# Altium PCB flexible-hand-warmer-left.PcbDoc (part 2 of 3)
Units mm, origin at the board's own origin, x right, y up, seen from the top; angles counter-clockwise.
Board outline 135.63 x 180.34 mm, 18 copper layers (F.Cu, F.Mask, B.Cu, B.Mask, F.SilkS, B.SilkS, F.Adhes, B.Adhes, F.Paste, B.Paste, Dwgs.User, Cmts.User, Eco1.User, Eco2.User, Edge.Cuts, Margin, B.CrtYd, F.CrtYd); 2 components, 1 nets, 2 pads, 0 vias.
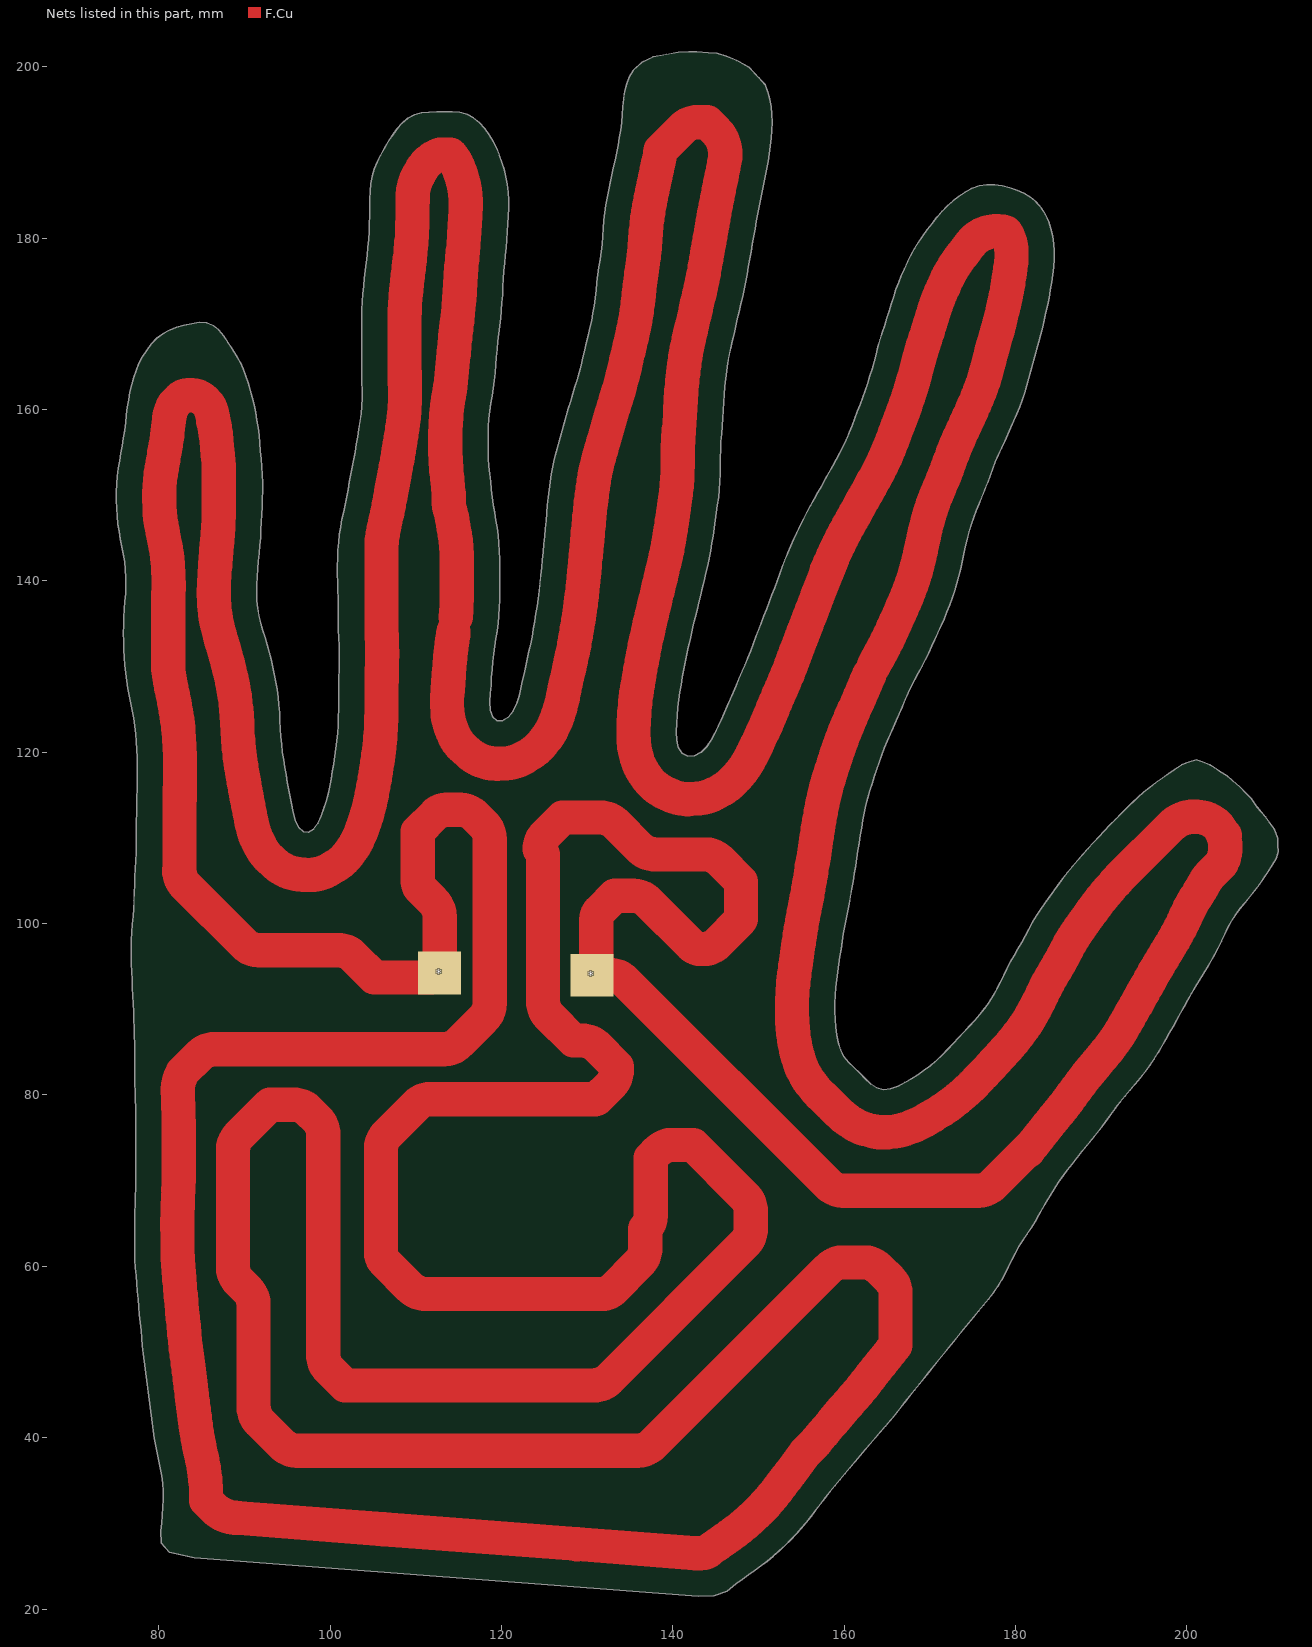
[diagram p4: the nets of this part, all layers, seen from the top]

## Nets (pads, with @x,y where several pads share a name; then routed paths per layer and width w, separated by ;. In a path a pad name is that pad's centre, name@x,y a point inside that pad or via, vN(x,y) a via of type N, cw(c..) or ccw(c..) an arc to the next point about the centre after c; other vN are vias at no path point)
GND: *.1 | length 1512.7
  F.Cu w4: 82.359,106.272 ccw(c84.899,106.272) 83.103,104.476 ; 86.356,158.582 cw(c82.571,157.286) 86.521,157.917 ; 86.441,139.683 86.415,138.76 ccw(c91.413,138.621) 86.415,138.498 86.437,137.586 ccw(c91.436,137.702) 86.459,137.223 86.544,136.331 ccw(c91.522,136.805) 86.611,135.866 86.777,134.996 ccw(c91.689,135.926) 86.849,134.674 87.068,133.823 ccw(c91.91,135.067) 87.097,133.713 87.332,132.876 ccw(c92.148,134.219) 87.367,132.755 87.595,132.011 cw(c83.769,130.842) 87.619,131.928 87.822,131.21 cw(c83.972,130.124) 87.83,131.179 88.032,130.441 ; 86.441,139.683 cw(c91.439,139.551) 86.445,139.801 86.49,140.719 cw(c91.484,140.477) 86.498,140.842 86.566,141.771 cw(c91.552,141.403) 86.568,141.804 86.64,142.7 ccw(c82.652,143.018) 86.641,142.715 86.71,143.625 cw(c91.695,143.236) 86.719,143.728 86.77,144.249 86.805,144.603 ccw(c82.824,144.992) 86.808,144.636 86.873,145.363 ccw(c82.889,145.719) 86.882,145.489 86.924,146.218 ccw(c82.93,146.447) 86.925,146.248 86.967,147.084 ccw(c82.972,147.284) 86.968,147.111 86.985,147.49 86.985,153.269 ccw(c82.988,153.117) 86.985,153.273 86.976,153.497 ccw(c82.979,153.345) 86.968,153.648 86.952,153.849 ccw(c82.964,153.546) 86.95,153.879 86.878,154.742 ccw(c82.892,154.408) 86.876,154.757 86.798,155.648 ccw(c82.813,155.299) 86.798,155.652 86.732,156.394 ccw(c82.748,156.041) 86.716,156.542 86.64,157.147 ccw(c82.671,156.646) 86.624,157.261 86.566,157.628 86.524,157.9 ; 88.032,130.441 cw(c84.174,129.386) 88.05,130.372 88.231,129.659 cw(c84.355,128.674) 88.246,129.601 88.41,128.913 cw(c84.519,127.986) 88.431,128.817 88.564,128.191 cw(c84.652,127.359) 88.588,128.071 88.714,127.375 cw(c84.777,126.664) 88.721,127.331 88.838,126.643 cw(c84.894,125.976) 88.858,126.513 88.943,125.879 cw(c84.98,125.343) 88.956,125.777 89.03,125.099 cw(c85.053,124.666) 89.039,124.999 89.096,124.323 cw(c85.11,123.989) 89.104,124.211 89.145,123.476 cw(c85.151,123.254) 89.148,123.419 89.183,122.558 ccw(c94.179,122.76) 89.188,122.457 89.244,121.54 ccw(c94.235,121.836) 89.256,121.375 89.34,120.469 ccw(c94.319,120.925) 89.353,120.343 89.457,119.449 ccw(c94.424,120.022) 89.477,119.301 89.604,118.417 ccw(c94.553,119.13) 89.626,118.281 89.776,117.406 cw(c85.833,116.731) 89.777,117.402 89.925,116.528 ccw(c94.855,117.362) 89.933,116.482 90.089,115.607 ccw(c95.012,116.481) 90.098,115.559 90.201,115.012 90.263,114.681 ccw(c95.177,115.603) 90.267,114.66 90.433,113.791 ccw(c95.345,114.726) 90.44,113.755 90.608,112.898 cw(c86.682,112.129) 90.609,112.89 90.779,112.014 ccw(c95.689,112.962) 90.853,111.691 91.09,110.782 ccw(c95.929,112.042) 91.458,109.803 91.856,109.008 ccw(c96.33,111.239) 92.926,107.576 93.46,107.081 ccw(c96.863,110.744) 96.291,105.777 96.878,105.709 ccw(c97.46,110.675) 97.345,105.676 ccw(c97.46,110.675) 100.022,106.381 100.615,106.734 ccw(c98.06,111.032) 102.074,108.05 102.589,108.743 ccw(c98.578,111.728) 103.153,109.71 103.531,110.566 ccw(c98.958,112.588) 103.673,110.922 103.974,111.774 ccw(c99.259,113.44) 104.021,111.915 104.288,112.745 ccw(c99.529,114.278) 104.358,112.983 104.585,113.831 ccw(c99.757,115.129) 104.641,114.06 104.831,114.928 ccw(c99.947,115.997) 104.865,115.1 105.026,115.975 ccw(c100.108,116.876) 105.031,116.003 105.187,116.883 ccw(c100.264,117.758) 105.196,116.936 105.344,117.821 ccw(c100.412,118.643) 105.355,117.889 105.49,118.779 ccw(c100.547,119.533) 105.499,118.84 105.625,119.729 ccw(c100.673,120.427) 105.632,119.781 105.748,120.677 ccw(c100.791,121.325) 105.765,120.823 105.857,121.731 ccw(c100.882,122.233) 105.876,121.988 105.922,122.912 ccw(c100.928,123.16) 105.926,123.002 105.955,123.925 105.988,124.855 ccw(c100.992,125.034) 105.991,124.985 106.001,125.917 ccw(c101.001,125.966) 106.001,126.003 105.995,126.867 cw(c109.995,126.891) 105.995,126.917 106.001,127.742 cw(c110.001,127.713) 106.001,127.769 106.01,128.379 106.013,128.625 cw(c110.013,128.563) 106.014,128.643 106.033,129.542 ccw(c101.034,129.646) 106.033,129.551 106.05,130.484 ccw(c101.051,130.579) 106.051,130.487 106.068,131.418 ccw(c101.069,131.51) 106.068,131.607 106.051,132.527 ccw(c101.051,132.439) 106.047,132.654 106.006,133.596 ccw(c101.011,133.381) 106.004,133.633 105.978,134.154 105.978,144.058 cw(c109.978,144.058) 106.005,144.521 106.027,144.707 cw(c110,144.242) 106.042,144.821 106.129,145.413 cw(c110.086,144.831) 106.153,145.562 106.264,146.154 cw(c110.196,145.419) 106.284,146.255 106.443,146.996 cw(c110.354,146.156) 106.445,147.005 106.631,147.862 ccw(c101.745,148.924) 106.647,147.937 106.822,148.806 ccw(c101.921,149.798) 106.838,148.891 106.997,149.75 107.09,150.235 107.162,150.605 ccw(c102.252,151.553) 107.163,150.61 107.331,151.487 ccw(c102.421,152.429) 107.336,151.511 107.5,152.389 ccw(c102.585,153.308) 107.511,152.451 107.65,153.249 cw(c111.59,152.559) 107.663,153.318 107.817,154.111 ccw(c102.909,155.066) 107.843,154.259 107.988,155.14 ccw(c103.055,155.952) 107.99,155.15 108.132,156.025 108.278,156.899 ccw(c103.347,157.723) 108.292,156.985 108.425,157.876 ccw(c103.48,158.615) 108.435,157.95 108.556,158.854 ccw(c103.601,159.518) 108.582,159.08 108.661,159.986 ccw(c103.681,160.425) 108.672,160.138 108.724,161.043 ccw(c103.733,161.33) 108.733,161.323 108.734,162.242 ccw(c103.734,162.249) 108.733,162.358 108.712,163.262 cw(c112.711,163.352) 108.712,163.286 108.697,164.187 ccw(c103.698,164.106) 108.696,164.222 108.678,165.021 cw(c112.677,165.11) 108.677,165.147 108.685,165.952 ccw(c103.685,166.001) 108.685,166.001 108.685,167.894 ccw(c103.685,167.894) 108.685,167.9 108.684,168.847 ccw(c103.684,168.84) 108.684,168.882 108.676,169.756 cw(c112.676,169.787) 108.676,169.821 108.679,170.154 108.684,170.615 cw(c112.683,170.575) 108.685,170.675 108.705,171.461 cw(c112.704,171.355) 108.707,171.528 108.74,172.263 cw(c112.736,172.084) 108.745,172.362 108.794,173.052 cw(c112.784,172.771) 108.802,173.153 108.878,173.94 cw(c112.859,173.552) 108.878,173.943 108.964,174.801 cw(c112.944,174.404) 108.967,174.836 109.051,175.607 cw(c113.027,175.17) 109.061,175.686 109.165,176.487 ccw(c104.208,177.139) 109.171,176.53 109.281,177.429 ccw(c104.319,178.04) 109.297,177.573 109.382,178.483 ccw(c104.404,178.951) 109.384,178.505 109.466,179.418 ccw(c104.486,179.863) 109.473,179.51 109.538,180.425 ccw(c104.551,180.782) 109.547,180.587 109.55,180.649 109.583,181.518 ccw(c104.587,181.714) 109.585,181.578 109.611,182.513 ccw(c104.613,182.649) 109.613,182.613 109.619,183.557 ccw(c107.619,183.573) 109.619,183.558 109.625,184.402 cw(c113.625,184.37) 109.627,184.486 109.643,185.026 cw(c113.641,184.901) 109.659,185.282 109.68,185.492 cw(c113.661,185.105) 109.733,185.859 cw(c113.662,185.109) 109.955,186.612 ; 110.388,187.522 110.356,187.464 ; 113.86,149.914 113.838,150.104 ; 114.397,134.142 cw(c110.4,134.314) 114.349,133.675 114.27,133.183 ccw(c119.205,132.383) 114.251,133.053 114.205,132.716 114.202,132.697 cw(c110.238,133.234) 114.201,132.69 114.129,132.163 ccw(c119.083,131.487) 114.111,132.014 114.015,131.11 ccw(c118.987,130.581) 114.009,131.052 113.923,130.145 ccw(c118.901,129.67) 113.915,130.054 113.844,129.146 ccw(c118.829,128.754) 113.837,129.033 113.828,128.877 113.79,128.218 cw(c109.797,128.446) 113.784,128.126 113.717,127.296 ccw(c118.701,126.892) 113.714,127.253 113.643,126.268 ccw(c118.63,125.908) 113.637,125.629 113.693,124.643 ccw(c118.685,124.917) 113.966,123.263 114.032,123.076 114.248,122.459 ccw(c118.967,124.113) 115.647,120.374 116.138,119.938 ccw(c119.457,123.678) 119.516,118.678 120.168,118.686 ccw(c120.109,123.685) 122.734,119.429 123.433,119.861 ccw(c120.809,124.117) 124.744,121.032 125.325,121.773 ccw(c121.389,124.858) 125.945,122.797 126.331,123.65 ccw(c121.777,125.713) 126.536,124.182 126.809,125.027 ccw(c122.05,126.562) 126.897,125.333 127.113,126.181 ccw(c122.268,127.418) 127.167,126.419 127.344,127.286 127.516,128.117 127.7,128.948 127.886,129.795 cw(c131.793,128.937) 127.891,129.822 128.081,130.657 ccw(c123.204,131.762) 128.083,130.668 ccw(c123.204,131.762) 128.088,130.687 128.278,131.55 ccw(c123.396,132.629) 128.303,131.668 128.474,132.538 ccw(c123.568,133.504) 128.496,132.655 128.648,133.532 ccw(c123.721,134.387) 128.655,133.576 128.796,134.431 cw(c132.742,133.779) 128.8,134.454 128.946,135.306 ccw(c124.019,136.156) 128.964,135.415 129.097,136.306 ccw(c124.152,137.047) 129.098,136.308 129.23,137.195 ccw(c124.286,137.938) 129.248,137.327 129.359,138.227 ccw(c124.396,138.838) 129.37,138.323 129.46,139.196 cw(c133.439,138.78) 129.463,139.223 129.561,140.092 ccw(c124.592,140.65) 129.569,140.174 129.656,141.084 129.742,141.987 ccw(c124.766,142.47) 129.747,142.036 129.821,142.887 cw(c133.806,142.54) 129.826,142.942 129.912,143.788 ccw(c124.937,144.291) 129.917,143.847 129.999,144.759 ccw(c125.019,145.204) 129.999,144.76 130.074,145.618 cw(c134.058,145.267) 130.079,145.671 130.165,146.514 ccw(c125.192,147.025) 130.173,146.592 130.248,147.453 cw(c134.233,147.103) 130.252,147.495 130.331,148.297 cw(c134.312,147.902) 130.337,148.348 130.423,149.115 cw(c134.398,148.664) 130.431,149.179 130.538,150 130.646,150.832 cw(c134.613,150.317) 130.655,150.895 130.761,151.621 cw(c134.718,151.039) 130.773,151.701 130.884,152.356 cw(c134.828,151.687) 130.906,152.472 131.011,152.995 cw(c134.932,152.206) 131.054,153.186 131.203,153.777 cw(c135.081,152.794) 131.214,153.819 131.413,154.567 cw(c135.278,153.536) 131.425,154.611 131.634,155.356 cw(c135.485,154.275) 131.646,155.397 131.878,156.19 ccw(c127.08,157.597) 131.894,156.247 132.124,157.066 cw(c135.974,155.982) 132.13,157.087 132.361,157.886 cw(c136.203,156.775) 132.365,157.9 132.602,158.708 cw(c136.439,157.58) 132.606,158.722 132.85,159.539 133.101,160.375 133.348,161.193 133.602,162.009 ccw(c128.828,163.497) 133.634,162.117 133.877,162.963 ccw(c129.071,164.342) 133.901,163.048 134.128,163.896 ccw(c129.299,165.194) 134.165,164.042 134.368,164.894 ccw(c129.505,166.055) 134.38,164.947 134.567,165.766 cw(c138.467,164.878) 134.576,165.805 134.77,166.62 ccw(c129.907,167.781) 134.773,166.63 134.976,167.492 135.179,168.348 ccw(c130.315,169.505) 135.198,168.431 135.389,169.298 ccw(c130.506,170.372) 135.417,169.433 135.584,170.306 ccw(c130.674,171.249) 135.606,170.426 135.753,171.311 ccw(c130.821,172.134) 135.774,171.45 135.898,172.345 ccw(c130.945,173.029) 135.914,172.47 136.015,173.374 ccw(c131.047,173.933) 136.02,173.414 136.105,174.227 cw(c140.083,173.809) 136.114,174.307 136.213,175.096 cw(c140.182,174.593) 136.215,175.109 136.322,175.932 cw(c140.289,175.413) 136.329,175.982 136.449,176.817 ccw(c131.501,177.53) 136.45,176.82 136.576,177.7 136.578,177.714 ccw(c131.629,178.423) 136.599,177.876 136.698,178.781 ccw(c131.728,179.328) 136.715,178.97 136.781,179.889 136.839,180.698 cw(c140.828,180.411) 136.847,180.795 136.918,181.523 cw(c140.899,181.131) 136.924,181.579 137,182.25 cw(c140.974,181.796) 137.019,182.393 137.112,183.005 cw(c141.066,182.401) 137.128,183.102 137.254,183.809 cw(c141.191,183.102) 137.264,183.86 137.421,184.671 ccw(c132.513,185.627) 137.425,184.693 137.579,185.504 cw(c141.509,184.756) 137.591,185.561 137.745,186.313 cw(c141.663,185.505) 137.755,186.359 137.925,187.134 cw(c141.831,186.274) 137.932,187.164 138.12,187.986 ccw(c133.248,189.107) 138.141,188.082 138.324,188.952 ccw(c133.43,189.978) 138.333,188.997 138.508,189.871 ccw(c133.605,190.852) 138.536,190.024 138.582,190.296 141.089,192.804 cw(c142.885,191.008) 142.885,193.548 144.018,193.548 144.958,192.608 cw(c142.126,189.783) 146.111,189.435 146.039,189.064 ccw(c150.948,188.114) 146.035,189.043 145.872,188.183 cw(c141.942,188.929) 145.87,188.171 145.712,187.355 cw(c141.785,188.113) 145.704,187.314 145.635,186.974 145.54,186.509 cw(c141.621,187.309) 145.536,186.49 145.359,185.645 ccw(c150.253,184.617) 145.344,185.57 145.175,184.699 cw(c141.248,185.46) 145.173,184.689 145.003,183.815 144.834,182.941 ccw(c149.743,181.99) 144.813,182.822 144.67,181.979 cw(c140.726,182.649) 144.664,181.947 144.595,181.561 cw(c140.656,182.258) 144.594,181.556 144.514,181.104 ccw(c149.436,180.224) 144.51,181.084 144.357,180.206 ccw(c149.282,179.342) 144.351,180.174 144.211,179.343 cw(c140.267,180.011) 144.203,179.298 144.054,178.473 cw(c140.117,179.181) 144.051,178.46 143.894,177.591 ccw(c148.814,176.697) 143.889,177.56 143.735,176.686 cw(c139.795,177.375) 143.733,176.674 143.592,175.862 143.582,175.814 cw(c139.659,176.597) 143.58,175.803 143.436,175.091 cw(c139.515,175.885) 143.428,175.057 143.266,174.291 cw(c139.353,175.12) 143.254,174.233 143.128,173.68 cw(c139.226,174.563) 143.126,173.673 143.086,173.498 cw(c139.186,174.385) 143.073,173.441 142.881,172.651 ccw(c147.739,171.465) 142.867,172.593 142.667,171.73 ccw(c147.539,170.602) 142.649,171.645 142.473,170.823 142.294,170.055 142.088,169.247 ccw(c146.934,168.014) 142.058,169.121 142.035,169.021 141.862,168.261 ccw(c146.737,167.149) 141.844,168.179 141.662,167.317 ccw(c146.553,166.279) 141.629,167.149 141.475,166.273 ccw(c146.397,165.397) 141.446,166.095 141.321,165.206 ccw(c146.271,164.503) 141.312,165.14 141.197,164.241 ccw(c146.156,163.605) 141.188,164.174 141.085,163.27 ccw(c146.052,162.701) 141.071,163.133 140.992,162.217 ccw(c145.974,161.788) 140.982,162.085 140.927,161.168 ccw(c145.918,160.864) 140.926,161.146 140.875,160.246 140.874,160.223 ccw(c145.866,159.94) 140.871,160.164 140.834,159.353 cw(c136.838,159.535) 140.828,159.251 140.777,158.525 cw(c136.787,158.809) 140.771,158.455 140.697,157.625 ccw(c145.678,157.179) 140.69,157.534 140.625,156.611 ccw(c145.613,156.26) 140.618,156.484 140.576,155.555 ccw(c145.571,155.331) 140.572,155.397 140.559,154.456 ccw(c145.559,154.39) 140.559,154.382 140.559,153.539 cw(c136.559,153.54) 140.558,153.451 140.542,152.713 cw(c136.543,152.801) 140.539,152.627 140.51,151.954 cw(c136.514,152.128) 140.501,151.812 140.463,151.329 cw(c136.475,151.641) 140.462,151.321 140.45,151.167 cw(c136.462,151.483) 140.441,151.068 140.423,150.901 cw(c136.444,151.312) 140.423,150.897 140.372,150.413 cw(c136.394,150.828) 140.357,150.288 140.255,149.539 ccw(c145.209,148.857) 140.251,149.507 140.143,148.687 cw(c136.177,149.207) 140.134,148.622 140.018,147.837 cw(c136.061,148.422) 140.013,147.804 139.881,146.963 ccw(c144.819,146.18) 139.866,146.861 139.856,146.79 cw(c135.893,147.335) 139.856,146.787 139.756,146.066 cw(c135.794,146.614) 139.743,145.981 139.619,145.206 cw(c135.669,145.839) 139.617,145.191 139.494,144.444 cw(c135.547,145.092) 139.475,144.335 139.351,143.694 cw(c135.423,144.45) 139.33,143.594 139.182,142.915 cw(c135.274,143.771) 139.166,142.847 138.98,142.062 ccw(c143.844,140.906) 138.969,142.017 138.775,141.168 cw(c134.876,142.06) 138.773,141.157 138.598,140.405 cw(c134.702,141.307) 138.577,140.317 138.384,139.56 ccw(c143.228,138.323) 138.368,139.495 138.161,138.641 ccw(c143.02,137.463) 138.147,138.585 137.971,137.822 cw(c134.074,138.725) 137.95,137.736 137.758,136.983 ccw(c142.602,135.743) 137.733,136.882 137.533,136.027 cw(c133.638,136.937) 137.532,136.02 137.331,135.169 ccw(c142.197,134.019) 137.315,135.1 137.129,134.256 cw(c133.225,135.129) 137.124,134.236 136.934,133.406 ccw(c141.807,132.288) 136.919,133.338 136.732,132.469 ccw(c141.621,131.419) 136.716,132.387 136.543,131.513 ccw(c140.467,130.738) 136.538,131.49 136.534,131.464 136.475,131.159 136.37,130.61 ccw(c141.28,129.667) 136.358,130.546 136.201,129.665 ccw(c141.123,128.786) 136.196,129.636 136.042,128.742 135.891,127.859 ccw(c140.82,127.019) 135.882,127.804 135.741,126.915 ccw(c140.679,126.131) 135.716,126.737 135.607,125.848 ccw(c140.569,125.231) 135.585,125.638 135.511,124.723 ccw(c140.494,124.316) 135.501,124.584 135.501,124.574 cw(c131.507,124.796) 135.5,124.568 135.449,123.656 ccw(c140.441,123.373) 135.447,123.613 135.401,122.637 ccw(c140.395,122.401) 135.4,122.196 135.438,121.234 ccw(c140.434,121.432) 135.57,120.275 135.78,119.389 ccw(c140.645,120.543) 136.466,117.798 136.525,117.709 136.903,117.132 ccw(c141.086,119.871) 138.824,115.412 139.242,115.2 139.488,115.075 ccw(c141.751,119.534) 142.087,114.545 142.881,114.599 ccw(c142.548,119.588) 143.049,114.613 ccw(c142.548,119.588) 144.92,115.186 145.679,115.595 ccw(c143.31,119.998) 146.896,116.515 147.523,117.159 ccw(c143.944,120.65) 147.588,117.227 ccw(c143.944,120.65) 148.084,117.846 148.599,118.605 ccw(c144.464,121.416) 148.85,119.016 149.278,119.797 ccw(c144.895,122.203) 149.418,120.071 149.792,120.864 ccw(c145.272,123.001) 149.806,120.894 150.175,121.688 ccw(c145.64,123.794) 150.183,121.705 150.548,122.5 ccw(c146.006,124.589) 150.585,122.582 150.936,123.383 ccw(c146.357,125.39) 150.955,123.427 151.295,124.228 cw(c154.976,122.662) 151.299,124.236 151.637,125.024 ccw(c147.043,126.998) 151.671,125.105 151.98,125.859 cw(c155.68,124.338) 151.997,125.9 152.295,126.601 cw(c155.976,125.034) 152.315,126.647 152.643,127.391 ; 114.643,135.805 ccw(c110.662,136.187) 114.644,135.809 114.689,136.286 ccw(c110.708,136.667) 114.701,136.43 114.739,137.072 ccw(c110.746,137.309) 114.744,137.178 114.767,137.89 ccw(c110.769,138.022) 114.769,137.981 114.775,138.567 ccw(c110.776,138.611) 114.775,138.573 114.777,138.776 ccw(c110.778,138.818) 114.778,138.816 114.778,139.683 ccw(c110.778,139.685) 114.778,139.713 114.771,140.62 cw(c119.771,140.665) 114.771,140.719 114.779,141.476 ccw(c110.779,141.522) 114.779,141.522 114.779,142.236 114.779,142.431 ccw(c110.779,142.422) 114.777,142.536 114.758,143.203 ccw(c110.76,143.09) 114.752,143.336 114.713,143.964 ccw(c110.721,143.717) 114.703,144.093 114.642,144.74 114.55,145.383 ccw(c110.59,144.819) 114.532,145.501 114.403,146.244 cw(c119.328,147.105) 114.395,146.291 114.25,147.167 cw(c119.182,147.99) 114.245,147.193 114.21,147.411 ccw(c110.261,146.773) 114.115,147.845 113.968,148.373 cw(c117.822,149.445) 113.838,149.088 113.838,150.104 ; 145.245,27.567 144.514,27.056 ccw(c147.376,22.956) 144.241,26.851 144.142,26.771 ccw(c146.65,23.655) 143.996,26.648 cw(c142.902,30.496) 142.601,26.507 128.799,27.572 106.209,29.314 89.36,30.614 88.896,30.65 cw(c89.206,34.637) 86.381,31.805 85.514,32.672 ccw(c80.516,32.798) 85.516,32.834 85.51,33.765 ccw(c80.51,33.734) 85.496,34.103 85.442,34.848 85.429,35.021 ccw(c80.442,34.656) 85.399,35.316 85.281,36.205 ccw(c80.324,35.557) 85.238,36.475 85.074,37.354 ccw(c80.159,36.436) 85.045,37.501 84.86,38.348 cw(c88.769,39.196) 84.857,38.361 84.688,39.157 cw(c88.602,39.983) 84.679,39.2 84.543,39.889 cw(c88.467,40.664) 84.522,40.003 84.416,40.639 cw(c88.362,41.293) 84.401,40.738 84.299,41.466 cw(c88.261,42.016) 84.294,41.509 84.186,42.358 ccw(c79.226,41.726) 84.18,42.399 84.062,43.272 cw(c88.027,43.803) 84.061,43.285 83.948,44.153 cw(c87.915,44.664) 83.947,44.159 83.835,45.043 83.822,45.149 83.727,45.91 cw(c87.697,46.403) 83.724,45.932 83.622,46.805 ccw(c78.656,46.221) 83.616,46.854 83.501,47.753 ccw(c78.541,47.12) 83.495,47.797 83.377,48.666 cw(c87.341,49.2) 83.375,48.682 83.261,49.557 83.157,50.364 cw(c87.124,50.876) 83.147,50.442 83.063,51.221 cw(c87.04,51.647) 83.06,51.246 82.98,52.058 cw(c86.96,52.452) 82.975,52.112 82.903,52.963 ccw(c77.92,52.54) 82.89,53.091 82.793,53.965 cw(c86.769,54.402) 82.791,53.988 82.711,54.761 cw(c86.69,55.168) 82.703,54.85 82.639,55.663 ccw(c77.654,55.269) 82.631,55.749 82.55,56.595 cw(c86.533,56.971) 82.546,56.643 82.477,57.499 ccw(c77.493,57.095) 82.474,57.536 82.395,58.432 cw(c86.38,58.779) 82.394,58.44 82.318,59.342 ccw(c77.336,58.922) 82.317,59.356 82.288,59.69 82.253,60.086 cw(c86.239,60.429) 82.243,60.245 82.212,60.93 cw(c86.208,61.107) 82.21,60.979 82.184,61.828 cw(c86.182,61.95) 82.183,61.855 82.165,62.608 cw(c86.164,62.7) 82.164,62.7 82.164,63.24 82.165,63.557 ccw(c77.165,63.565) 82.165,63.575 82.163,64.493 ccw(c77.163,64.484) 82.163,64.516 82.159,65.314 cw(c86.159,65.332) 82.16,65.417 82.175,66.121 cw(c86.174,66.028) 82.178,66.206 82.216,67.038 ccw(c77.221,67.263) 82.218,67.104 82.248,68.036 82.28,68.963 ccw(c77.283,69.134) 82.281,68.998 82.306,69.934 ccw(c77.308,70.07) 82.308,70.015 82.318,70.957 ccw(c77.318,71.012) 82.318,71.062 82.309,71.967 cw(c86.309,72.007) 82.309,72.007 82.309,74.775 cw(c86.309,74.775) 82.309,74.798 82.314,75.721 ccw(c77.314,75.749) 82.314,75.777 82.31,76.715 ccw(c77.31,76.699) 82.31,76.744 82.302,77.683 ccw(c77.302,77.642) 82.301,77.767 82.277,78.688 ccw(c77.279,78.563) 82.276,78.734 82.246,79.639 82.216,80.509 cw(c86.214,80.639) 82.216,80.536 82.212,80.696 cw(c86.21,80.58) 82.804,82.677 84.727,84.6 cw(c86.523,82.804) 86.523,85.344 113.248,85.344 ccw(c113.248,87.884) 115.044,86.088 117.874,88.918 ccw(c116.078,90.714) 118.618,90.714 118.618,109.819 ccw(c116.078,109.819) 117.874,111.615 116.949,112.54 ccw(c115.153,110.744) 115.153,113.284 113.538,113.284 ccw(c113.538,111.444) 112.237,112.745 110.236,110.744 110.236,104.933 ccw(c111.537,104.933) 110.617,104.013 112.032,102.598 cw(c110.236,100.802) 112.776,100.802 *.1@112.776,94.234 cw(c111.55,95.46) 111.55,93.726 105.156,93.726 102.725,96.157 ccw(c100.929,94.361) 100.929,96.901 91.73,96.901 cw(c91.73,99.441) 89.934,97.645 83.103,104.476 ; 145.246,27.567 145.931,28.046 ccw(c143.636,31.322) 145.97,28.074 146.626,28.546 ccw(c144.29,31.793) 146.65,28.563 147.029,28.84 147.267,29.014 ccw(c144.906,32.244) 147.339,29.068 147.833,29.447 ccw(c145.398,32.62) 147.956,29.545 148.413,29.926 ccw(c145.853,32.999) 148.507,30.007 149.017,30.459 ccw(c146.362,33.451) 149.088,30.523 149.619,31.019 ccw(c146.892,33.945) 149.683,31.079 150.136,31.521 ccw(c147.346,34.387) 150.258,31.644 150.655,32.066 ccw(c147.741,34.807) 150.74,32.16 151.187,32.666 ccw(c148.186,35.311) 151.239,32.726 151.665,33.23 ccw(c148.612,35.813) 151.75,33.333 ; 151.75,33.333 152.148,33.837 ccw(c149.008,36.316) 152.205,33.912 152.685,34.549 cw(c156.684,31.548) 152.737,34.618 153.275,35.31 ccw(c150.117,37.765) 153.291,35.33 153.662,35.814 ccw(c150.489,38.249) 153.704,35.87 155.448,38.227 156.285,39.064 ccw(c153.454,41.89) 156.537,39.341 156.832,39.698 cw(c160.687,36.514) 156.887,39.763 157.459,40.434 ccw(c154.416,43.03) 157.477,40.455 158.043,41.128 cw(c161.873,37.915) 158.049,41.135 158.637,41.835 cw(c162.465,38.618) 158.658,41.859 159.254,42.558 ccw(c156.209,45.153) 159.256,42.561 159.843,43.252 cw(c163.655,40.016) 159.893,43.31 160.48,43.98 ccw(c157.469,46.613) 160.483,43.984 161.058,44.643 cw(c164.83,41.362) 161.071,44.658 161.561,45.217 ccw(c158.551,47.852) 161.641,45.311 162.031,45.787 ccw(c158.939,48.324) 162.1,45.873 162.522,46.418 ccw(c159.364,48.873) 162.526,46.423 162.54,46.441 ccw(c159.378,48.891) 162.565,46.474 162.848,46.846 163.084,47.157 cw(c167.067,44.135) 163.145,47.237 163.713,47.954 cw(c167.635,44.852) 163.739,47.986 164.31,48.696 cw(c168.206,45.562) 164.329,48.719 164.899,49.42 ; 152.643,127.391 ccw(c148.07,129.411) 152.654,127.414 153.003,128.216 ccw(c148.419,130.213) 153.024,128.266 153.365,129.071 ccw(c148.759,131.018) 153.431,129.237 153.742,130.05 ccw(c149.072,131.835) 153.762,130.104 154.064,130.92 154.339,131.662 cw(c158.09,130.273) 154.365,131.731 154.652,132.463 ccw(c150.929,133.926) 154.663,132.491 ; 154.43,95.984 ccw(c159.376,95.249) 154.426,95.953 154.299,95.075 ccw(c159.247,94.356) 154.293,95.033 154.171,94.139 ccw(c159.125,93.461) 154.154,94.001 154.056,93.104 ccw(c159.026,92.556) 154.04,92.928 153.971,92.012 ccw(c158.957,91.637) 153.965,91.911 153.913,90.981 ccw(c158.905,90.703) 153.905,90.738 153.899,89.795 ccw(c158.898,89.761) 153.902,89.578 153.936,88.64 ccw(c158.933,88.822) 153.946,88.456 154,87.723 154.013,87.537 ccw(c159,87.9) 154.046,87.223 154.168,86.329 ccw(c159.122,87.004) 154.221,86.016 154.395,85.147 ccw(c159.298,86.128) 154.54,84.592 154.809,83.757 ccw(c159.569,85.287) 155.117,83.012 155.507,82.245 ccw(c159.963,84.512) 156.045,81.405 156.581,80.728 ccw(c160.504,83.829) 157.024,80.238 157.677,79.605 158.23,79.071 cw(c155.45,76.195) 158.322,78.979 158.864,78.42 ccw(c162.458,81.896) 159.027,78.258 159.259,78.039 159.676,77.645 ccw(c163.109,81.281) 160.357,77.106 161.047,76.651 ccw(c163.802,80.823) 162.629,75.963 163.386,75.78 ccw(c164.568,80.638) 165.071,75.663 165.916,75.75 ccw(c165.41,80.724) 167.136,76.031 167.99,76.345 ccw(c166.268,81.039) 168.575,76.603 169.375,77.019 ccw(c167.077,81.459) 169.553,77.115 169.843,77.281 ccw(c167.867,80.758) 169.845,77.281 169.848,77.284 170.32,77.553 ccw(c167.846,81.897) 170.488,77.652 171.24,78.12 ccw(c168.6,82.366) 171.436,78.248 172.17,78.754 ccw(c169.335,82.872) 172.403,78.924 173.118,79.48 ccw(c170.051,83.428) 173.259,79.594 173.96,80.179 ccw(c170.758,84.019) 174.204,80.396 174.878,81.036 ccw(c171.438,84.664) 175.026,81.182 175.676,81.852 ccw(c172.088,85.334) 175.696,81.873 176.336,82.54 ccw(c172.729,86.003) 176.387,82.593 177.007,83.257 ccw(c173.355,86.673) 177.032,83.284 177.644,83.948 cw(c180.583,81.235) 177.648,83.952 178.263,84.616 ccw(c174.599,88.019) 178.293,84.649 178.914,85.328 ccw(c175.225,88.704) 179.029,85.458 179.626,86.157 ccw(c175.826,89.406) 179.74,86.295 180.304,87.004 ccw(c176.392,90.118) 180.43,87.17 180.959,87.893 ccw(c176.923,90.844) 181.149,88.172 181.622,88.92 ccw(c177.397,91.594) 181.756,89.144 181.899,89.399 182.187,89.912 ccw(c177.828,92.362) 182.277,90.079 182.676,90.856 ccw(c178.229,93.142) 182.735,90.973 183.114,91.762 183.427,92.411 cw(c187.029,90.672) 183.486,92.529 183.757,93.044 cw(c187.297,91.182) 183.817,93.154 184.164,93.766 184.593,94.5 ccw(c180.278,97.024) 184.597,94.505 185.041,95.267 ccw(c180.722,97.786) 185.103,95.377 185.526,96.144 ccw(c181.147,98.557) 185.567,96.219 185.973,96.987 cw(c189.508,95.115) 185.976,96.992 186.301,97.604 cw(c189.832,95.724) 186.377,97.74 186.618,98.152 cw(c190.07,96.132) 186.723,98.321 187.034,98.797 cw(c190.38,96.605) 187.08,98.866 187.493,99.467 cw(c190.79,97.203) 187.526,99.515 187.995,100.177 cw(c191.258,97.863) 188.004,100.19 188.513,100.901 cw(c191.767,98.575) 188.515,100.905 188.999,101.58 cw(c192.249,99.248) 189.03,101.622 189.464,102.21 cw(c192.681,99.833) 189.522,102.287 189.918,102.797 cw(c193.076,100.342) 190.001,102.9 190.471,103.464 cw(c193.542,100.902) 190.486,103.482 190.999,104.089 cw(c194.052,101.504) 191.051,104.148 ; 154.43,95.985 154.556,96.839 ccw(c150.599,97.423) 154.56,96.867 154.68,97.723 cw(c159.633,97.035) 154.691,97.795 154.825,98.676 cw(c159.769,97.925) 154.833,98.723 154.976,99.607 cw(c159.912,98.812) 154.982,99.644 155.131,100.527 cw(c160.061,99.696) 155.15,100.634 155.315,101.503 cw(c160.228,100.573) 155.327,101.562 155.656,103.202 ccw(c151.734,103.989) 155.673,103.294 155.802,104.026 ccw(c151.863,104.721) 155.809,104.066 155.948,104.902 cw(c160.881,104.088) 155.966,105.008 156.116,105.814 ccw(c152.184,106.546) 156.127,105.874 156.152,106.023 ccw(c152.21,106.699) 156.21,106.68 ccw(c152.417,107.949) 156.367,107.32 156.398,107.512 ccw(c152.448,108.145) 156.4,107.527 156.53,108.359 ccw(c152.578,108.977) 156.536,108.395 156.655,109.208 ccw(c152.698,109.791) 156.66,109.242 156.779,110.099 cw(c161.732,109.413) 156.789,110.167 156.924,111.057 cw(c161.867,110.303) 156.943,111.172 157.097,112.045 ccw(c153.158,112.739) 157.099,112.052 157.252,112.931 cw(c162.177,112.068) 157.271,113.037 157.442,113.902 cw(c162.349,112.942) 157.465,114.015 157.651,114.87 cw(c162.538,113.81) 157.68,114.994 157.887,115.846 cw(c162.746,114.67) 157.94,116.047 158.182,116.892 cw(c162.989,115.516) 158.218,117.013 158.478,117.845 cw(c163.251,116.354) 158.492,117.886 158.76,118.721 cw(c163.52,117.189) 158.777,118.772 159.051,119.595 cw(c163.796,118.02) 159.085,119.695 159.373,120.508 ccw(c155.603,121.844) 159.377,120.518 159.664,121.333 cw(c164.38,119.671) 159.704,121.443 160.014,122.261 cw(c164.69,120.489) 160.052,122.358 160.375,123.162 cw(c165.016,121.3) 160.412,123.25 160.752,124.052 cw(c165.357,122.105) 160.778,124.114 161.125,124.908 cw(c165.707,122.906) 161.149,124.96 161.483,125.705 ccw(c157.835,127.345) 161.503,125.749 161.81,126.454 ccw(c158.142,128.05) 161.828,126.496 162.146,127.25 cw(c166.755,125.311) 162.161,127.286 162.505,128.085 cw(c167.1,126.114) 162.523,128.126 162.875,128.927 cw(c167.452,126.915) 162.954,129.098 ; 154.769,132.767 154.663,132.491 ; 157.892,141.025 158.006,141.31 ; 158.049,141.415 158.32,142.038 cw(c161.989,140.446) 158.343,142.09 158.65,142.771 cw(c162.295,141.125) 158.672,142.82 ; 163.409,130.029 163.816,130.806 cw(c168.242,128.48) 163.856,130.88 164.27,131.636 ccw(c160.758,133.553) 164.274,131.645 164.626,132.294 ccw(c161.108,134.199) 164.678,132.394 164.976,132.982 ccw(c161.406,134.787) 165.011,133.054 165.323,133.703 ccw(c161.718,135.436) 165.348,133.756 165.68,134.473 ccw(c162.05,136.153) 165.687,134.488 166.028,135.234 ccw(c162.391,136.899) 166.03,135.237 ; 164.9,49.42 ccw(c161.796,51.944) 164.902,49.423 165.446,50.095 ccw(c162.337,52.611) 165.467,50.12 165.997,50.787 165.997,56.868 ccw(c163.802,56.868) 165.354,58.42 164.066,59.708 ccw(c162.27,57.912) 162.27,60.452 159.893,60.452 ccw(c159.893,57.999) 158.159,59.734 137.65,39.225 cw(c135.854,41.021) 135.854,38.481 96.175,38.481 cw(c96.175,41.021) 94.379,39.225 91.803,41.801 cw(c93.599,43.597) 91.059,43.597 91.059,55.463 ccw(c88.519,55.463) 90.315,57.259 89.39,58.184 cw(c91.186,59.98) 88.646,59.98 88.646,73.497 cw(c91.186,73.497) 89.39,75.293 92.964,78.867 95.722,78.867 cw(c95.722,76.327) 97.518,78.123 98.443,77.198 cw(c96.647,75.402) 99.187,75.402 99.187,49.693 ccw(c101.727,49.693) 99.931,47.897 101.727,46.101 130.774,46.101 ccw(c130.774,48.641) 132.57,46.845 148.354,62.629 ccw(c146.558,64.425) 149.098,64.425 149.098,66.385 ccw(c146.558,66.385) 148.354,68.181 142.367,74.168 139.99,74.168 ccw(c139.99,71.628) 138.194,73.424 137.414,72.644 137.414,65.922 cw(c135.246,65.922) 136.779,64.389 136.779,62.139 cw(c134.239,62.139) 136.035,60.343 132.969,57.277 cw(c131.743,58.503) 131.743,56.769 111.161,56.769 cw(c111.161,59.309) 109.365,57.513 106.426,60.452 cw(c107.652,61.678) 105.918,61.678 105.918,73.624 cw(c108.458,73.624) 106.662,75.42 110.109,78.867 cw(c111.642,77.334) 111.642,79.502 130.884,79.502 ccw(c130.884,79.936) 131.191,79.629 132.733,81.171 ccw(c130.937,82.967) 133.477,82.967 133.477,83.312 131.173,85.616 ccw(c129.377,83.82) 129.377,86.36 128.397,86.36 125.585,89.172 cw(c127.381,90.968) 124.841,90.968 124.841,107.756 ccw(c123.54,107.756) 124.46,108.676 cw(c127,108.676) 125.204,110.472 127.127,112.395 131.536,112.395 cw(c131.536,109.855) 133.332,111.651 136.162,108.821 ccw(c137.958,110.617) 137.958,108.077 143.728,108.077 cw(c143.728,105.537) 145.524,107.333 147.955,104.902 147.955,100.816 cw(c147.088,100.816) 147.701,100.203 145.27,97.772 cw(c143.474,99.568) 143.474,97.028 143.383,97.028 cw(c143.383,98.868) 142.082,97.567 137.142,102.507 ccw(c135.346,100.711) 135.346,103.251 133.223,103.251 131.513,101.541 ccw(c132.597,100.457) 131.064,100.457 131.064,95.206 cw(c129.33,95.206) *.1@130.556,93.98 132.679,93.98 cw(c132.679,91.44) 134.475,93.236 158.133,69.578 ccw(c159.929,71.374) 159.929,68.834 175.605,68.834 ccw(c175.605,71.374) 177.401,69.578 181.839,74.016 ccw(c179.008,76.842) 182.179,74.404 ; 166.39,136.04 166.459,136.194 ; 166.39,136.041 166.459,136.194 ; 166.525,136.341 166.459,136.194 ; 168.251,140.821 168.325,141.068 ; 171.701,174.571 cw(c168.029,176.157) 171.497,174.164 171.297,173.709 ccw(c174.96,172.101) 171.266,173.636 171.015,173.033 ccw(c174.709,171.499) 170.972,172.925 170.773,172.403 ccw(c174.512,170.98) 170.719,172.253 170.524,171.669 ccw(c174.319,170.403) 170.504,171.607 170.273,170.873 ccw(c174.088,169.672) 170.265,170.847 170.017,170.041 ccw(c173.842,168.868) 170.017,170.039 169.763,169.208 cw(c164.98,170.665) 169.739,169.131 169.471,168.3 cw(c164.711,169.83) 169.454,168.248 169.212,167.522 ccw(c173.007,166.258) 169.183,167.43 168.987,166.789 ccw(c172.813,165.622) 168.963,166.71 168.78,166.058 ccw(c172.631,164.976) 168.756,165.969 168.564,165.217 cw(c163.72,166.456) 168.552,165.172 168.325,164.319 cw(c163.493,165.603) 168.31,164.263 168.074,163.415 cw(c163.257,164.755) 168.047,163.32 167.851,162.665 167.85,162.662 ccw(c171.682,161.517) 167.849,162.66 167.796,162.482 cw(c163.005,163.913) 167.751,162.339 167.475,161.507 cw(c162.729,163.081) 167.465,161.478 167.186,160.653 cw(c162.448,162.251) 167.167,160.598 166.879,159.776 cw(c162.159,161.425) 166.847,159.688 166.543,158.868 cw(c161.855,160.605) 166.507,158.773 166.217,158.036 ccw(c169.94,156.574) 166.192,157.971 166.058,157.612 166.057,157.608 165.916,157.229 cw(c161.229,158.971) 165.913,157.222 165.607,156.402 cw(c160.923,158.152) 165.571,156.309 165.249,155.496 cw(c160.601,157.339) 165.212,155.405 164.875,154.601 cw(c160.263,156.533) 164.793,154.416 164.424,153.625 cw(c159.893,155.74) 164.342,153.459 163.946,152.684 cw(c159.493,154.959) 163.875,152.551 163.462,151.799 cw(c159.955,153.723) 163.461,151.797 163.052,151.04 cw(c158.652,153.415) 163.021,150.983 162.593,150.215 cw(c158.224,152.646) 162.572,150.176 162.148,149.43 161.731,148.681 cw(c158.234,150.622) 161.723,148.667 161.295,147.902 ccw(c164.785,145.948) 161.293,147.9 160.866,147.134 160.474,146.434 ccw(c163.965,144.48) 160.443,146.378 160.084,145.709 ccw(c163.608,143.816) 160.064,145.671 159.728,145.03 ccw(c163.273,143.177) 159.687,144.949 159.384,144.335 ccw(c162.971,142.564) 159.35,144.264 159.016,143.553 158.673,142.82 ; 171.701,174.571 171.983,175.226 cw(c175.656,173.64) 172.071,175.415 172.178,175.631 cw(c175.759,173.849) 172.253,175.773 172.458,176.146 cw(c175.963,174.22) 172.58,176.353 172.812,176.721 cw(c176.194,174.585) 172.899,176.853 173.255,177.37 cw(c176.546,175.097) 173.296,177.428 173.697,177.986 cw(c176.944,175.649) 173.762,178.074 174.227,178.683 cw(c177.405,176.254) 174.236,178.694 174.63,179.206 cw(c177.796,176.761) 174.764,179.371 175.012,179.658 cw(c178.04,177.044) 175.178,179.839 175.195,179.856 cw(c177.806,176.826) 178.877,180.679 cw(c175.495,178.544) 179.39,179.453 179.394,179.435 cw(c175.499,178.527) 179.448,179.161 179.477,178.98 cw(c175.528,178.346) 179.518,178.622 179.526,178.506 cw(c175.536,178.23) 179.535,178.162 179.531,177.924 cw(c175.532,177.991) 179.519,177.673 179.485,177.243 cw(c175.497,177.561) 179.467,177.07 179.397,176.501 cw(c175.427,176.992) 179.38,176.383 179.309,175.918 179.263,175.621 ccw(c184.204,174.857) 179.255,175.568 179.135,174.737 179.01,173.996 178.87,173.309 cw(c174.951,174.11) 178.851,173.22 178.677,172.458 ccw(c183.551,171.343) 178.665,172.407 178.658,172.373 cw(c174.749,173.222) 178.656,172.364 178.6,172.106 cw(c174.691,172.956) 178.598,172.097 178.567,171.958 cw(c174.658,172.806) 178.565,171.948 178.499,171.647 cw(c174.592,172.501) 178.478,171.554 178.302,170.832 cw(c174.416,171.779) 178.295,170.803 178.097,170.016 cw(c174.218,170.992) 178.088,169.983 177.912,169.308 cw(c174.042,170.317) 177.878,169.183 177.671,168.483 ccw(c182.464,167.062) 177.661,168.451 177.418,167.611 ccw(c182.22,166.217) 177.398,167.54 177.166,166.698 ccw(c181.986,165.367) 177.138,166.592 176.923,165.744 cw(c173.045,166.723) 176.921,165.734 ; 176.921,165.734 176.729,164.976 cw(c172.85,165.952) 176.706,164.889 176.681,164.799 176.523,164.225 cw(c172.667,165.289) 176.5,164.145 176.33,163.573 cw(c172.497,164.717) 176.278,163.414 176.086,162.856 cw(c172.304,164.159) 176.057,162.775 175.834,162.17 cw(c172.081,163.554) 175.791,162.059 175.54,161.434 cw(c171.829,162.93) 175.517,161.379 175.226,160.687 cw(c171.538,162.237) 175.206,160.641 174.897,159.931 cw(c171.229,161.527) 174.881,159.896 174.562,159.179 cw(c170.909,160.811) 174.544,159.141 174.227,158.451 cw(c170.592,160.12) 174.202,158.396 173.855,157.672 ccw(c178.365,155.512) 173.811,157.576 173.452,156.784 ccw(c178.004,154.716) 173.424,156.721 173.075,155.926 ccw(c177.653,153.915) 173.003,155.753 172.681,154.94 ccw(c177.331,153.102) 172.638,154.825 172.337,154.008 172.329,153.986 172.06,153.247 cw(c168.301,154.613) 172.034,153.175 171.788,152.538 cw(c168.055,153.976) 171.753,152.451 171.469,151.762 cw(c167.771,153.286) 171.461,151.742 171.133,150.958 ccw(c175.745,149.028) 171.127,150.944 170.793,150.14 ccw(c175.41,148.22) 170.74,150.006 170.428,149.19 ccw(c175.098,147.403) 170.361,149.005 170.081,148.177 ccw(c174.817,146.573) 170.024,147.995 169.775,147.159 ccw(c174.567,145.731) 169.719,146.953 169.502,146.098 ccw(c174.35,144.874) 169.479,146 169.28,145.142 ccw(c174.151,144.011) 169.26,145.051 169.076,144.19 ccw(c173.965,143.142) 169.067,144.149 168.905,143.363 cw(c164.988,144.174) 168.889,143.293 168.735,142.607 cw(c164.833,143.488) 168.713,142.518 168.557,141.892 ; 181.496,73.484 182.026,74.202 cw(c186.052,71.238) 182.09,74.288 182.179,74.404 ; 191.051,104.148 191.59,104.759 cw(c194.589,102.112) 191.6,104.771 192.167,105.408 198.09,111.332 cw(c200.915,108.499) 203.615,111.451 ; 199.796,100.705 199.578,100.222 ; 204.417,110.31 cw(c208.2,113.58) 204.022,110.833 203.847,111.098 ; 83.103,104.476 cw(c84.746,106.118) 82.423,106.118 82.423,113.773 82.429,114.655 cw(c86.429,114.623) 82.43,114.706 82.449,115.591 ccw(c77.45,115.698) 82.449,115.601 82.467,116.53 ccw(c77.468,116.627) 82.468,116.588 82.475,117.509 ccw(c77.475,117.548) 82.475,117.517 82.481,118.441 ccw(c77.481,118.472) 82.48,118.553 82.465,119.478 ccw(c77.466,119.397) 82.46,119.637 82.415,120.566 ccw(c77.421,120.326) 82.413,120.614 82.404,120.775 82.359,121.542 ccw(c77.368,121.255) 82.357,121.586 82.297,122.503 ccw(c77.307,122.176) 82.27,122.784 82.16,123.685 ccw(c77.197,123.077) 82.134,123.866 81.992,124.754 ccw(c77.055,123.964) 81.976,124.849 81.82,125.722 ccw(c76.898,124.845) 81.79,125.878 81.61,126.731 cw(c85.524,127.554) 81.607,126.742 81.448,127.514 cw(c85.366,128.319) 81.434,127.586 81.313,128.234 cw(c85.246,128.963) 81.292,128.361 81.191,129.029 cw(c85.146,129.624) 81.182,129.092 81.137,129.427 cw(c85.102,129.955) 81.102,129.955 81.102,138.21 cw(c85.102,138.21) 81.106,138.375 81.143,139.266 ccw(c76.147,139.473) 81.146,139.568 81.129,140.497 ccw(c76.13,140.409) 81.122,140.688 81.102,141.04 81.07,141.62 ccw(c76.078,141.342) 81.058,141.78 80.979,142.686 ccw(c75.998,142.255) 80.942,143.002 80.807,143.892 ccw(c75.864,143.145) 80.765,144.132 80.592,144.997 80.429,145.82 cw(c84.352,146.596) 80.421,145.859 80.283,146.595 cw(c84.216,147.326) 80.269,146.676 80.189,147.167 cw(c84.137,147.812) 80.155,147.432 80.118,147.821 cw(c84.1,148.197) 80.104,148.014 80.074,148.681 cw(c84.07,148.86) 80.073,148.716 80.046,149.479 cw(c84.043,149.618) 80.043,149.599 80.041,150.174 cw(c84.041,150.186) 80.045,150.374 80.074,150.969 cw(c84.069,150.776) 80.08,151.066 80.125,151.685 cw(c84.114,151.39) 80.14,151.848 80.181,152.197 80.181,152.201 cw(c84.154,151.735) 80.182,152.205 80.196,152.329 cw(c84.169,151.865) 80.226,152.535 80.329,153.141 cw(c84.272,152.466) 80.335,153.177 80.486,154.01 ccw(c75.567,154.905) 80.504,154.115 80.636,154.94 cw(c84.586,154.306) 80.645,154.993 80.773,155.725 80.789,155.813 ccw(c75.864,156.674) 80.803,155.902 80.942,156.791 ccw(c76.002,157.563) 80.967,156.972 81.075,157.874 ccw(c76.11,158.465) 81.079,157.91 81.172,158.742 cw(c85.147,158.293) 81.18,158.801 81.211,159.047 cw(c85.178,158.532) 81.788,160.655 82.355,161.222 cw(c83.439,160.138) 83.439,161.671 83.811,161.671 cw(c83.811,159.503) 85.344,161.036 85.78,160.6 85.782,160.597 cw(c82.323,158.588) 86.242,159.389 86.288,159.165 cw(c82.369,158.362) 86.29,159.156 86.367,158.774 cw(c82.448,157.976) 86.384,158.685 86.506,158.01 cw(c82.569,157.301) 86.521,157.917 ; 86.521,157.917 cw(c82.571,157.286) 86.524,157.9 ; 86.521,157.917 86.524,157.9 ; 109.955,186.612 110.003,186.731 ; 109.955,186.612 109.999,186.722 cw(c113.707,185.222) 110.003,186.731 ; 110.003,186.731 cw(c113.707,185.222) 110.118,186.987 ; 110.003,186.731 cw(c113.707,185.222) 110.118,186.987 ; 110.118,186.987 cw(c113.707,185.222) 110.119,186.989 110.271,187.299 ; 110.118,186.987 110.271,187.299 ; 110.271,187.299 110.285,187.326 cw(c113.873,185.559) 110.286,187.329 ; 110.271,187.299 110.286,187.329 ; 110.286,187.329 cw(c113.873,185.559) 110.356,187.464 ; 110.286,187.329 cw(c113.873,185.559) 110.356,187.464 ; 110.356,187.464 cw(c113.873,185.559) 110.358,187.467 110.589,187.892 cw(c114.102,185.981) 112.803,189.764 ccw(c112.745,193.764) 112.896,189.767 112.957,189.769 cw(c113.107,185.772) 112.987,189.77 113.444,189.784 cw(c113.569,185.786) 113.5,189.786 113.907,189.793 cw(c113.979,185.793) 113.911,189.793 114.02,189.795 cw(c111.04,187.127) 114.29,189.459 114.318,189.419 cw(c111.069,187.086) 114.485,189.168 114.588,188.998 cw(c111.173,186.916) 114.743,188.72 114.782,188.643 cw(c111.214,186.835) 114.787,188.632 cw(c111.217,186.828) 114.94,188.292 115.042,188.031 cw(c111.32,186.568) 115.096,187.886 115.171,187.67 cw(c111.396,186.348) 115.174,187.662 115.181,187.643 cw(c111.405,186.322) 115.185,187.63 cw(c111.41,186.31) 115.19,187.616 115.256,187.428 cw(c111.48,186.109) 115.315,187.245 115.454,186.774 cw(c111.619,185.638) 115.495,186.627 115.586,186.272 cw(c111.71,185.283) 115.65,185.972 115.708,185.641 cw(c111.768,184.951) 115.736,185.452 115.78,185.105 cw(c111.812,184.604) 115.807,184.796 115.823,184.461 cw(c111.828,184.269) 115.828,184.253 115.826,183.755 cw(c111.826,183.771) 115.821,183.576 115.789,182.922 cw(c111.794,183.116) 115.785,182.857 115.764,182.529 cw(c111.772,182.784) 115.763,182.52 115.758,182.436 cw(c111.766,182.69) 115.757,182.427 115.739,182.147 cw(c111.747,182.403) 115.739,182.14 115.73,182.006 ccw(c120.719,181.677) 115.727,181.954 115.709,181.631 115.704,181.542 cw(c111.71,181.76) 115.704,181.534 115.703,181.521 cw(c111.709,181.737) 115.702,181.511 115.678,181.072 cw(c111.684,181.294) 115.675,181.034 115.654,180.703 cw(c111.662,180.959) 115.653,180.694 115.62,180.176 cw(c111.628,180.436) 115.618,180.158 115.563,179.371 cw(c111.573,179.649) 115.555,179.272 115.481,178.485 cw(c111.498,178.858) 115.479,178.469 115.478,178.457 ccw(c120.457,178) 115.475,178.425 115.405,177.622 cw(c111.419,177.959) 115.404,177.605 115.403,177.597 cw(c111.417,177.936) 115.397,177.529 115.311,176.688 ccw(c120.285,176.179) 115.298,176.549 115.251,175.905 115.231,175.635 ccw(c120.217,175.261) 115.226,175.567 115.17,174.642 ccw(c120.161,174.338) 115.167,174.587 115.124,173.727 115.059,172.882 114.99,172.013 114.911,171.185 114.818,170.354 114.709,169.487 ccw(c119.67,168.864) 114.7,169.408 114.601,168.503 ccw(c119.571,167.959) 114.588,168.374 114.516,167.508 114.427,166.65 ccw(c119.401,166.137) 114.412,166.469 114.029,162.738 113.986,162.46 cw(c110.033,163.074) 113.974,162.384 113.941,162.2 cw(c110.001,162.888) 113.94,162.194 113.892,161.917 cw(c109.951,162.603) 113.89,161.909 113.835,161.592 ccw(c118.759,160.725) 113.824,161.529 113.681,160.646 ccw(c118.615,159.839) 113.637,160.304 113.552,159.393 ccw(c118.53,158.928) 113.541,159.26 113.479,158.331 ccw(c118.468,157.999) 113.471,158.165 113.44,157.236 ccw(c118.438,157.071) 113.438,157.112 113.43,156.18 ccw(c118.43,156.141) 113.43,156.08 113.441,155.16 ccw(c118.441,155.221) 113.444,155.046 113.476,154.137 ccw(c118.473,154.313) 113.485,153.969 113.546,153.068 ccw(c118.535,153.406) 113.561,152.894 113.653,152.001 113.739,151.104 ccw(c118.716,151.583) 113.74,151.094 113.83,150.182 ccw(c118.805,150.673) 113.838,150.104 ; 154.663,132.491 154.976,133.303 ccw(c150.312,135.106) 154.997,133.358 155.281,134.121 cw(c159.029,132.721) 155.3,134.17 155.594,134.925 ccw(c150.935,136.741) 155.614,134.978 155.908,135.758 cw(c159.651,134.347) 155.921,135.792 156.218,136.558 cw(c159.947,135.112) 156.221,136.566 156.533,137.366 ccw(c151.877,139.189) 156.554,137.421 156.863,138.239 ccw(c152.187,140.007) 156.89,138.309 156.951,138.48 cw(c160.712,137.119) 156.993,138.591 158.673,142.82 ; 166.03,135.237 166.34,135.929 ; 166.03,135.237 166.035,135.25 166.34,135.929 ; 166.34,135.929 166.389,136.039 ccw(c170.947,133.983) 166.384,136.028 166.34,135.929 ; 166.459,136.194 166.724,136.781 ccw(c163.076,138.422) 166.744,136.826 167.033,137.492 ccw(c163.364,139.086) 167.064,137.566 167.325,138.201 ccw(c163.625,139.721) 167.357,138.282 167.6,138.912 ccw(c163.868,140.351) 167.631,138.996 167.869,139.654 ccw(c164.105,141.009) 167.891,139.717 168.098,140.324 ccw(c164.312,141.617) 168.141,140.459 168.325,141.068 ; 168.325,141.068 ccw(c164.497,142.226) 168.346,141.139 ; 168.325,141.068 ccw(c164.497,142.226) 168.346,141.139 ; 168.346,141.139 168.526,141.775 ccw(c164.676,142.862) 168.557,141.892 ; 168.346,141.139 168.525,141.772 ccw(c164.676,142.862) 168.557,141.892 ; 182.18,74.404 182.253,74.5 ; 182.179,74.404 182.253,74.5 ; 182.253,74.5 182.636,74.998 ; 182.253,74.5 182.636,74.998 ; 182.636,74.998 cw(c186.603,71.955) 182.697,75.077 ; 182.636,74.998 cw(c186.603,71.955) 182.697,75.077 ; 182.697,75.077 183.253,75.773 ccw(c180.127,78.268) 183.263,75.785 183.828,76.5 cw(c187.743,73.389) 183.864,76.544 184.449,77.264 cw(c188.328,74.108) 184.47,77.289 185.024,77.962 ccw(c181.935,80.504) 185.055,78 185.543,78.609 ccw(c182.422,81.11) 185.59,78.668 186.037,79.248 ccw(c182.867,81.688) 186.085,79.312 186.561,79.957 ccw(c183.34,82.33) 186.563,79.96 187.077,80.66 ccw(c183.852,83.027) 187.089,80.676 187.603,81.385 cw(c191.649,78.446) 187.696,81.508 188.248,82.22 cw(c192.204,79.163) 188.344,82.341 188.92,83.042 cw(c192.784,79.869) 188.935,83.06 189.516,83.761 cw(c193.367,80.572) 189.597,83.855 190.099,84.433 ccw(c187.082,87.058) 190.186,84.536 190.618,85.068 ccw(c187.512,87.589) 190.662,85.123 191.073,85.648 ccw(c187.922,88.112) 191.165,85.77 191.525,86.269 ccw(c188.281,88.609) 191.588,86.359 191.931,86.863 ccw(c188.624,89.114) 192.015,86.992 192.341,87.513 ccw(c188.949,89.634) 192.391,87.595 192.769,88.234 ccw(c189.327,90.272) 192.784,88.258 193.15,88.889 ccw(c189.692,90.899) 193.2,88.977 193.487,89.5 193.565,89.643 cw(c197.952,87.246) 193.605,89.716 194.03,90.465 ccw(c190.551,92.439) 194.037,90.478 194.461,91.231 cw(c198.819,88.779) 194.468,91.244 194.892,91.993 ccw(c191.41,93.961) 194.899,92.005 195.308,92.735 ccw(c191.819,94.691) 195.32,92.756 195.73,93.498 196.158,94.272 cw(c200.534,91.854) 196.24,94.416 196.691,95.171 cw(c200.986,92.613) 196.717,95.215 197.159,95.941 ccw(c193.741,98.02) 197.173,95.964 197.61,96.694 cw(c201.9,94.127) 197.639,96.742 198.067,97.44 ccw(c194.656,99.529) 198.095,97.487 198.434,98.059 ccw(c194.995,100.101) 198.503,98.18 198.822,98.761 ccw(c195.313,100.682) 198.847,98.808 199.197,99.468 ; 199.197,99.468 ccw(c195.663,101.341) 199.227,99.526 ; 199.197,99.468 ccw(c195.663,101.341) 199.225,99.522 199.227,99.526 ; 199.227,99.526 199.497,100.055 ; 199.227,99.526 199.497,100.055 ; 199.497,100.055 ccw(c195.934,101.873) 199.578,100.222 ; 199.497,100.055 ccw(c195.934,101.873) 199.578,100.222 ; 199.578,100.222 199.852,100.828 cw(c204.407,98.766) 199.905,100.941 200.285,101.728 cw(c204.788,99.554) 200.417,101.983 200.784,102.644 200.842,102.748 cw(c205.215,100.324) 200.983,102.987 201.455,103.737 cw(c205.69,101.078) 201.581,103.928 ccw(c198.291,106.203) 201.797,104.277 202.124,104.872 cw(c205.629,102.945) 202.797,105.77 204.023,106.996 ccw(c200.505,108.9) 203.847,111.098 ; 203.615,111.451 cw(c200.276,109.248) 203.618,111.446 ; 203.615,111.451 203.618,111.446 ; 203.618,111.446 203.843,111.104 ; 203.618,111.446 203.842,111.105 cw(c200.505,108.9) 203.843,111.104 ; 203.843,111.104 cw(c200.505,108.9) 203.847,111.098 ; 203.843,111.104 203.847,111.098